# Altium PCB Main.PcbDoc
Units mm, origin at the board's own origin, x right, y up, seen from the top; angles counter-clockwise.
Board outline 26.86 x 26.25 mm, 2 copper layers (Top Layer, Bottom Layer), stack 1.135 mm thick; 12 components, 16 nets, 50 pads, 16 vias.
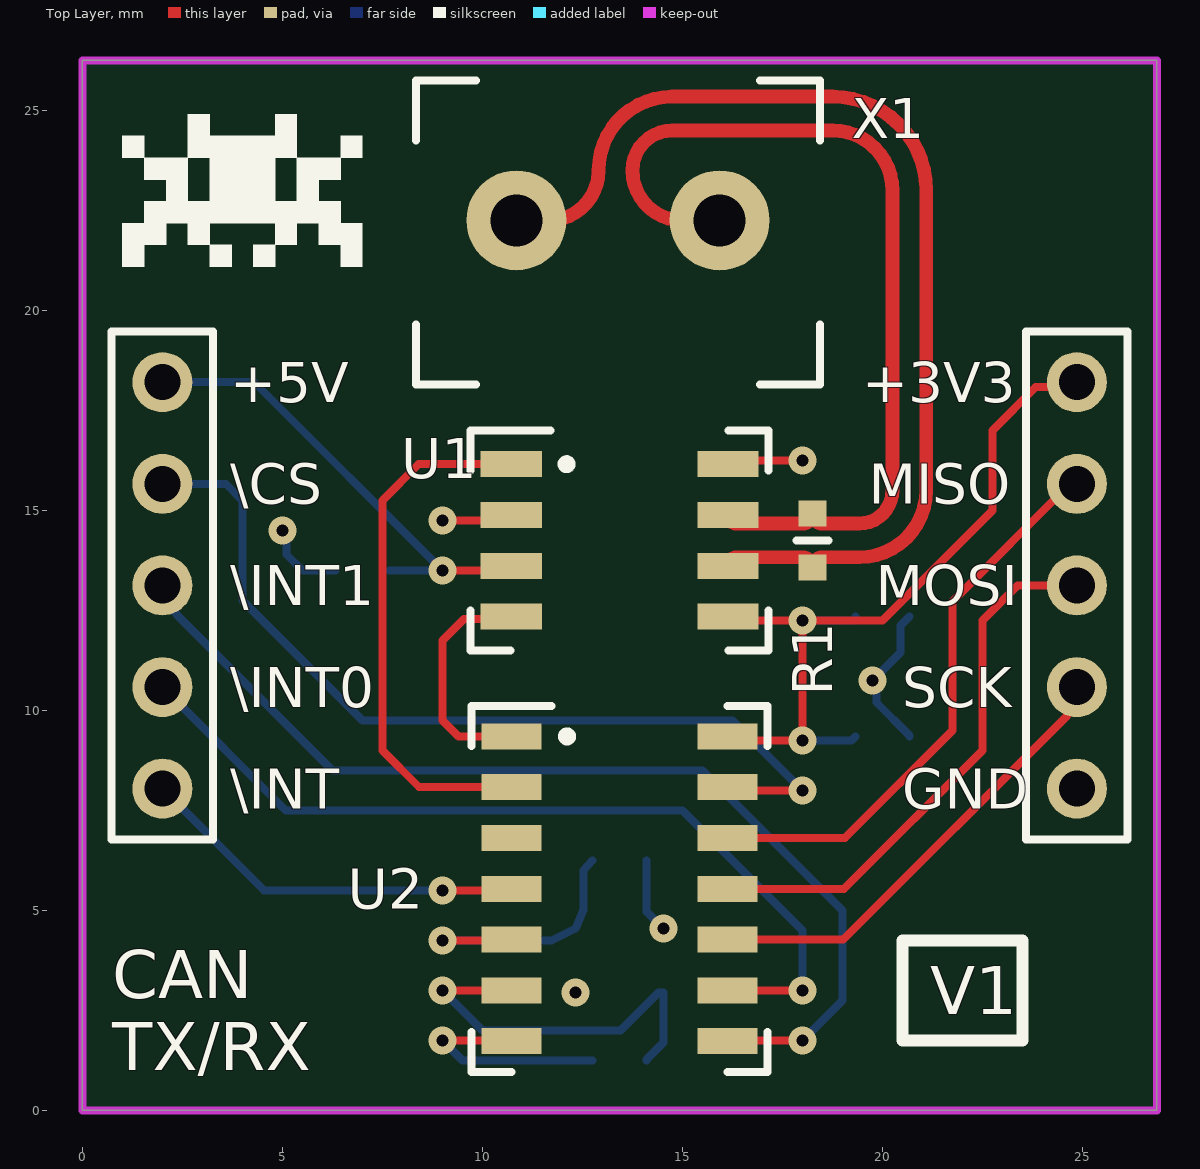
[diagram p0: Top Layer view]
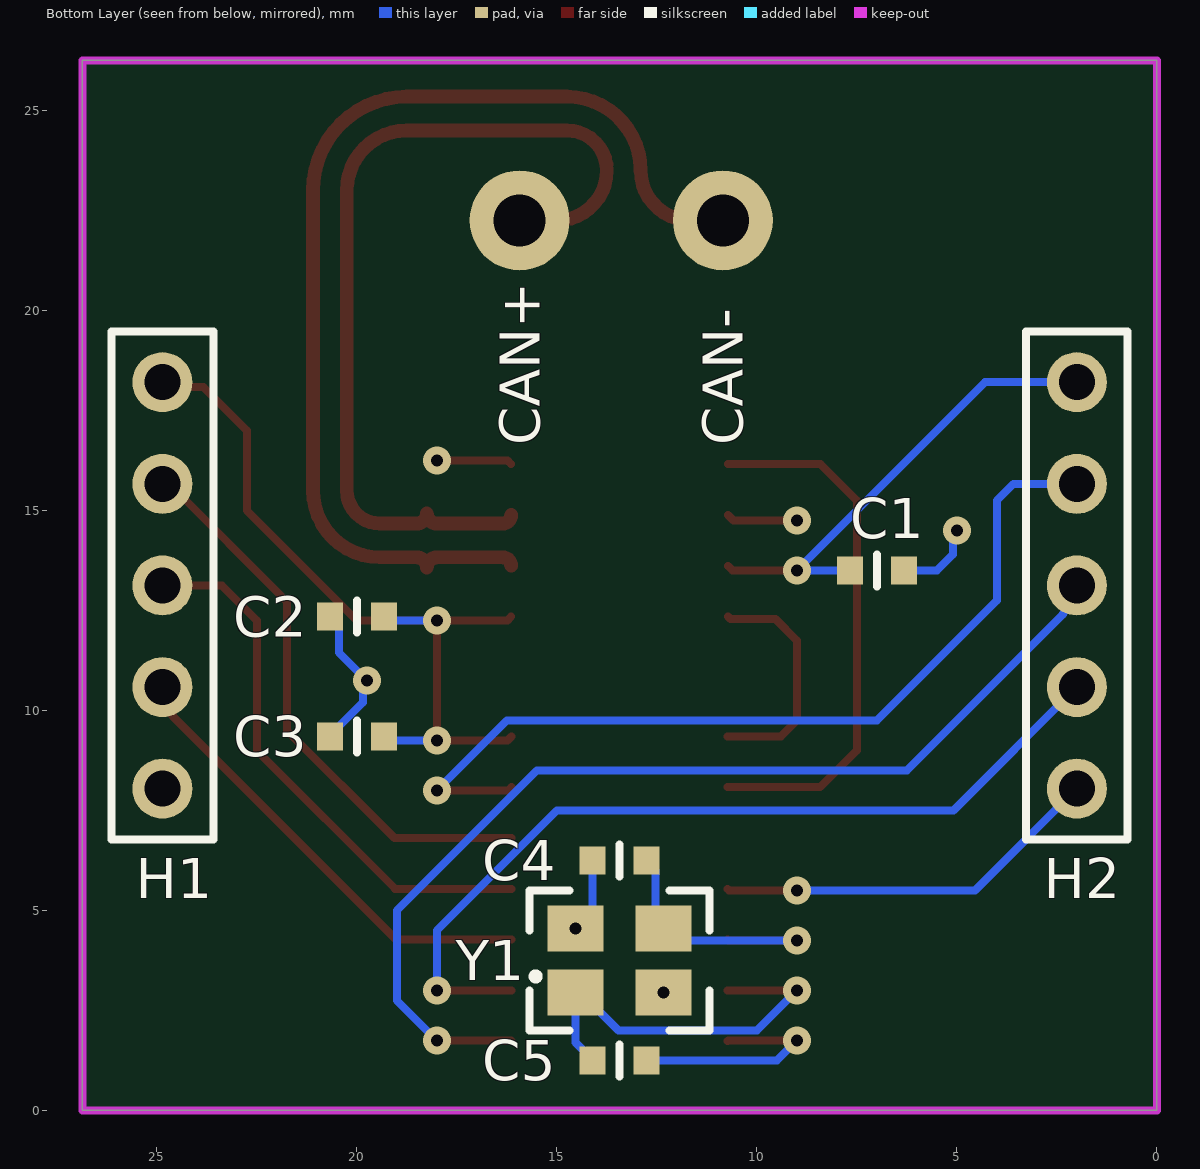
[diagram p1: Bottom Layer view, seen from below]
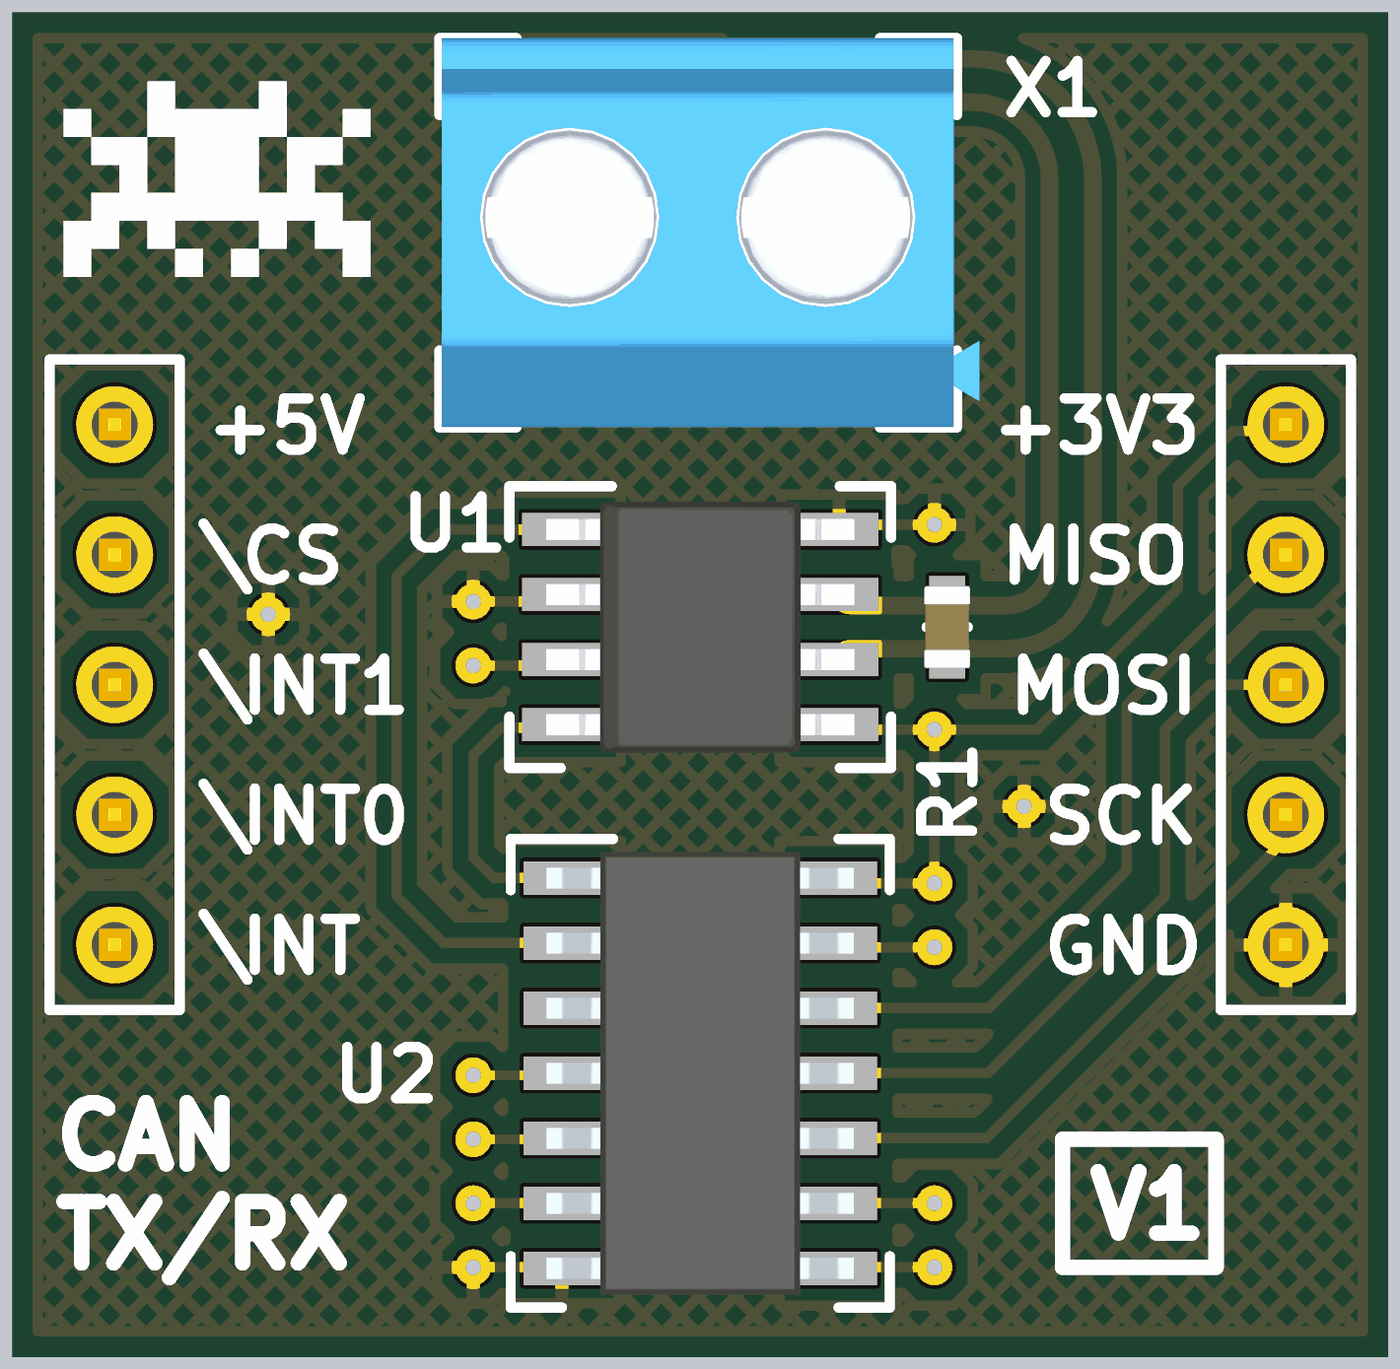
[diagram p2: 3D render of the assembled board from above, using the file's embedded part models]
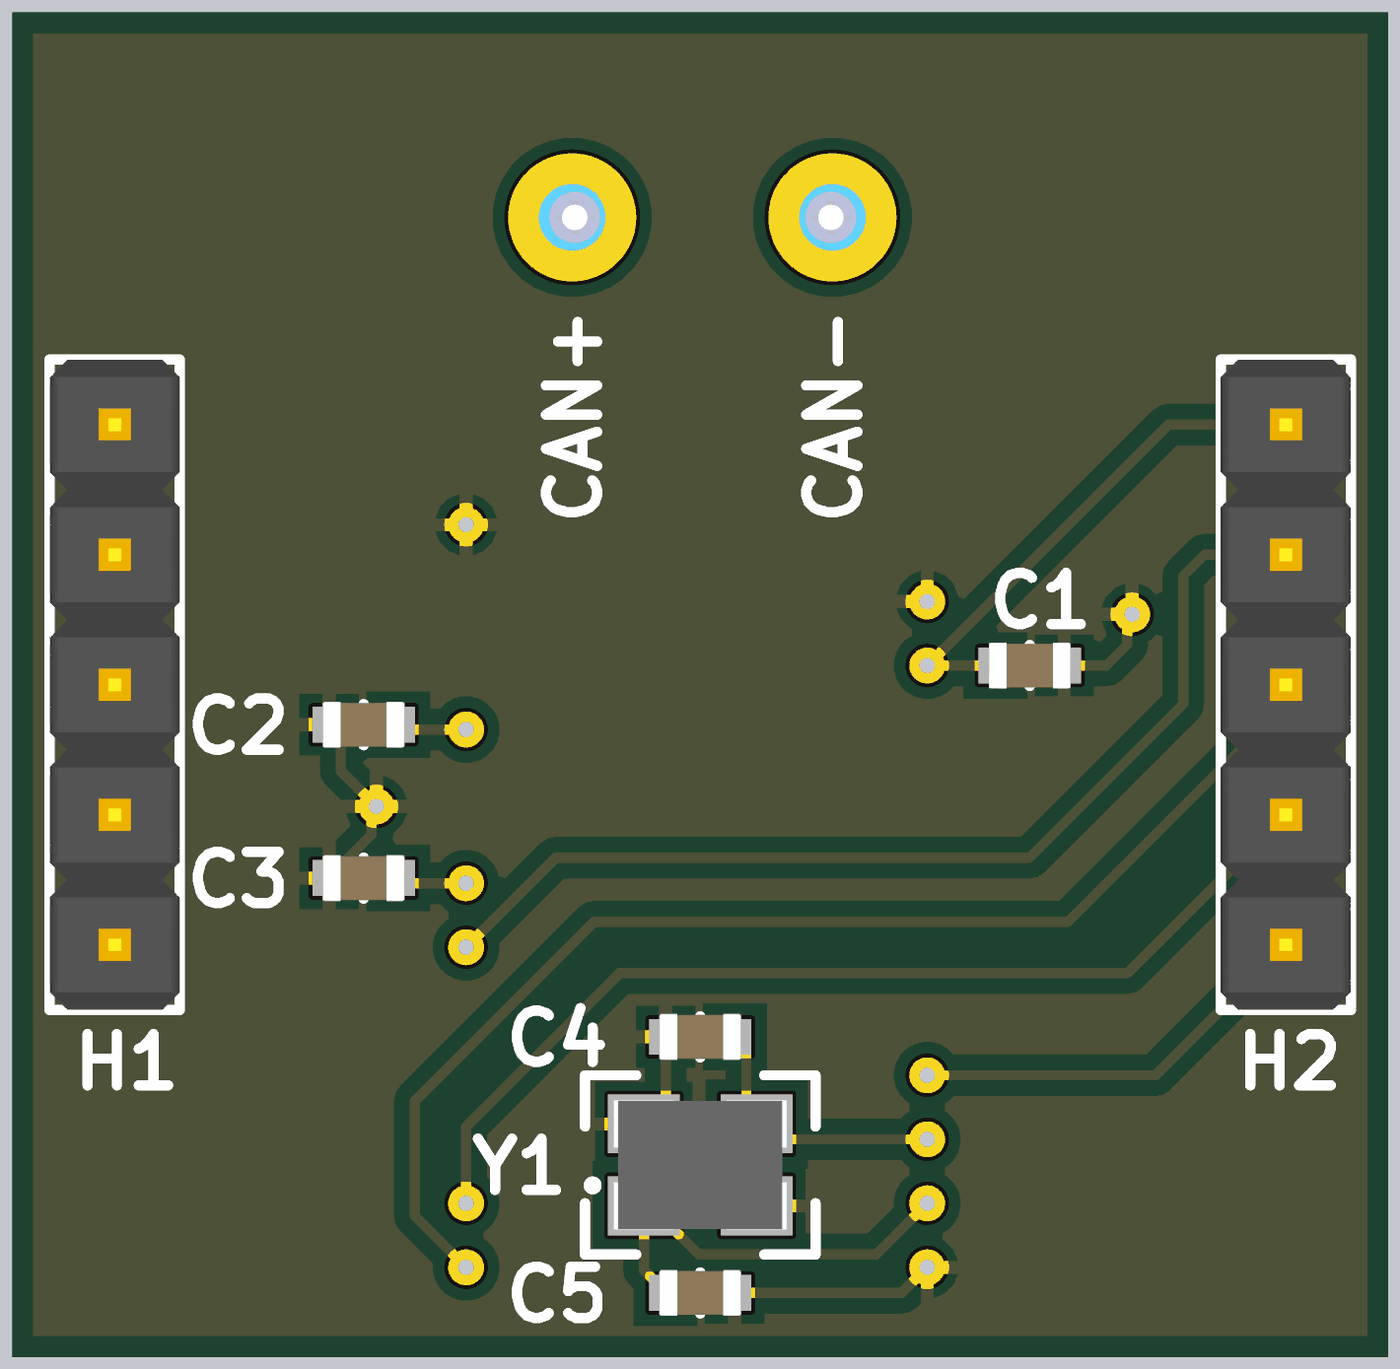
[diagram p3: 3D render of the assembled board from below, using the file's embedded part models]

## Layer stack, top to bottom
Top Solder: solder mask 0.0102, Solder Resist, Dk 3.8
Top Layer: signal copper 0.035
Dielectric 1: dielectric 1.065, FR-4, Dk 4.8
Bottom Layer: signal copper 0.035
Bottom Solder: solder mask 0.0102, Solder Resist, Dk 3.8

## Board outline
0,0 0,26.25 26.86,26.25 26.86,0

## Design rules (kind name [scope] priority, off if disabled: settings)
BoardOutlineClearance [All] p1: gap=0.2 ignorepadtopadclearanceinfootprint=FALSE
Clearance "inPolygon Clearance" [InPolygon] p1: gap=0.3 ignorepadtopadclearanceinfootprint=TRUE // this rule ensures that every net within a polygon of a different net has a set clearance from the poly
Clearance "Different Diff Pair" [All] p2: gap=0.2 ignorepadtopadclearanceinfootprint=TRUE
Clearance "Same Diff Pair" [All] p3: gap=0.1 ignorepadtopadclearanceinfootprint=TRUE
Clearance "Different Nets" [not InAnyDifferentialPair] p4: gap=0.3 ignorepadtopadclearanceinfootprint=TRUE except(0.1: Arc-SMDPad Arc-THPad Arc-Via Arc-Text Track-SMDPad Track-THPad Track-Via Track-Text SMDPad-Text THPad-Text Via-Text Fill-Text Poly-Text Region-Text Text-Text; 0.12: Arc-Arc Arc-Track Track-Track; 0.15: SMDPad-SMDPad SMDPad-THPad SMDPad-Via THPad-THPad THPad-Via Via-Via; 0.2: Arc-Hole Track-Hole SMDPad-Hole THPad-Hole Via-Hole Fill-Hole Poly-Hole Region-Hole Text-Hole)
Clearance "Same Net" [not InAnyDifferentialPair] p5: gap=0 ignorepadtopadclearanceinfootprint=TRUE except(0.1: THPad-Via; 0.18: Arc-Arc Arc-Track Track-Track)
ComponentClearance [All] p1: gap=0.102 collisioncheckmode=3 verticalgap=0.102 showdistances=TRUE
DiffPairsRouting "Ethernet Routing" [InDifferentialPairClass('Ethernet_Pairs')] p1: maxlimit=0.2 minlimit=0.2 mostfreqgap=0.2 toplayer_minwidth=0.25 toplayer_maxwidth=0.25 toplayer_prefwidth=0.25 bottomlayer_minwidth=0.25 bottomlayer_maxwidth=0.25 bottomlayer_prefwidth=0.25 impedanceprofiledriven=TRUE maxuncoupledlength=12.7
DiffPairsRouting "USB Routing" [InDifferentialPairClass('USB_Pairs')] p2: maxlimit=0.127 minlimit=0.127 mostfreqgap=0.127 toplayer_minwidth=0.23 toplayer_maxwidth=0.23 toplayer_prefwidth=0.23 bottomlayer_minwidth=0.23 bottomlayer_maxwidth=0.23 bottomlayer_prefwidth=0.23 impedanceprofiledriven=TRUE maxuncoupledlength=12.7
DiffPairsRouting "CAN Routing" [InDifferentialPairClass('CAN_Pairs')] p3: maxlimit=0.5 minlimit=0.5 mostfreqgap=0.5 toplayer_minwidth=0.345 toplayer_maxwidth=0.345 toplayer_prefwidth=0.345 bottomlayer_minwidth=0.345 bottomlayer_maxwidth=0.345 bottomlayer_prefwidth=0.345 impedanceprofiledriven=TRUE impedanceprofileid={5A9A793D-CB8E-4181-82AC-7E3341D9D95F} impedanceprofilevalue=120.000000 maxuncoupledlength=12.7
Height [All] p1: minheight=0 maxheight=1816.048 prefheight=12.7
HoleSize [All] p1: absolutevalues=TRUE maxlimit=6.3 minlimit=0.3 maxpercent=80.000 minpercent=20.000
HoleToHoleClearance [All] p1: gap=0.25 allowstackedmicrovias=FALSE
Length [All] p1: maxlimit=43.432 minlimit=0 usedelayunits=TRUE mindelay=0.000000 maxdelay=10000.000000
MatchedLengths "Diff Pair Matched Delays" [InDifferentialPairClass('Ethernet_Pairs') or InDifferentialPairClass('USB_Pairs') or InDifferentialPairClass('CAN_Pairs')] p1: tolerance=5 checknetsindiffpair=TRUE checkdiffpairvsdiffpair=FALSE checkxsignals=FALSE checkothers=FALSE usedelayunits=TRUE delaytolerance=100.000000
MinimumAnnularRing [All] p1: minimumring=0.2
MinimumSolderMaskSliver [All] p1: minsoldermaskwidth=0
PlaneClearance "Supply Net Clearance" [InNetClass('Supply_Nets')] p1: clearance=0.5
PlaneClearance "All Nets" [All] p2: clearance=0.3
PolygonConnect "Supply Nets" [InNetClass('Supply_Nets')] p1: connectstyle=Relief reliefconductorwidth=0.3 reliefentries=4 polygonreliefangle="90 Angle" conductorbypadedge=TRUE mindistance=0.381 enablemindistance=FALSE airgapwidth=0.254
PolygonConnect General [All] p2: connectstyle=Relief reliefconductorwidth=0.254 reliefentries=4 polygonreliefangle="90 Angle" airgapwidth=0.254
RoutingVias [All] p1: holewidth=0.2 width=0.35 viastyle="Through Hole" minholewidth=0.15 minwidth=0.3 maxholewidth=6.3 maxwidth=6.55
SilkToSilkClearance [All] p1: silktosilkclearance=0
SilkToSolderMaskClearance [All] p1: minsilkscreentomaskgap=0 clearancetoexposedcopper=TRUE
SolderMaskExpansion [All] p1: expansion=0.075 istentingtop=FALSE
SupplyNets "Schematic Supply Nets_3" [InNet('GND')] p1: voltage=0.000
SupplyNets "Schematic Supply Nets_2" [InNet('+5V')] p2: voltage=0.000
SupplyNets "Schematic Supply Nets_7" [InNet('+3V3')] p3: voltage=0.000
UnRoutedNet [All] p1: checkbadconnections=TRUE
Width "nRF Width" [InNetClass('nRF Signal')] p1: maxlimit=0.379 minlimit=0.379 preferedwidth=0.379 impedanceprofiledriven=TRUE minimp=50.000000 maximp=50.000000 favimp=50.000000 checkconnectedcopper=TRUE
Width [All] p2: maxlimit=100 minlimit=0.1 preferedwidth=0.3
20 further rules are at their usual default settings.

## Classes and differential pairs
differential pair class CAN_Pairs: CAN
component class Connectors: H2 X1
component class CAN: C2 C3 C5 R1 U1 U2 Y1
differential pair CAN: +CAN_P -CAN_N

## Components (designator, comment, footprint, x,y, rotation, side; value= is the part's Value field where it differs from the comment)
C1 "[Cap] 0603 0.1uF 10% 16V" "[Cap] SMD 0603" 7,13.5 r0 bottom (schematic designator C3)
C2 "[Cap] 0603 0.1uF 10% 16V" "[Cap] SMD 0603" 20,12.345 r180 bottom
C3 "[Cap] 0603 0.1uF 10% 16V" "[Cap] SMD 0603" 20,9.35 r180 bottom (schematic designator C1)
C4 "[Cap] 0603 15pF 1% 100V" "[Cap] SMD 0603" 13.43,6.25 r180 bottom (schematic designator C5)
C5 "[Cap] 0603 15pF 1% 100V" "[Cap] SMD 0603" 13.43,1.25 r0 bottom (schematic designator C4)
H1 "1x5 Header" "[Header] 1x5 Male" 24.86,13.125 r270 bottom (schematic designator H2)
H2 "1x5 Header" "[Header] 1x5 Male" 2,13.125 r270 bottom (schematic designator H1)
R1 "[120] SMD 0603 1% 1/10W" "[Res] SMD 0603" 18.25,14.25 r90 top
U1 "[CAN] Transceiver" "[CAN] Transceiver" 13.43,14.25 r0 top
U2 "[CAN] SPI-CAN FD Controller" "[CAN] SPI-CAN FD Controller" 13.43,5.54 r0 top
X1 "2pin Screw Terminal" "[Screw Terminal] 2pin 5mm" 13.43,22.25 r180 top (schematic designator X3)
Y1 "[Crystal] SMD 20MHz" "[Crystal] SMD 20MHz" 13.43,3.75 r180 bottom

## Footprints (in the part's own frame and the unit in brackets; to place one, negate y for a bottom-side part, rotate by r counter-clockwise, add the part's x,y. Pads: shape width x height; smd on the part's side, far side on the other; paste and mask are expansions set on the pad)
"[CAN] SPI-CAN FD Controller" [mm]
  rect 1.5x0.65 smd: 1(-2.7,3.81) 2(-2.7,2.54) 3(-2.7,1.27) 4(-2.7,0) 5(-2.7,-1.27) 6(-2.7,-2.54) 7(-2.7,-3.81) 8(2.7,-3.81) 9(2.7,-2.54) 10(2.7,-1.27) 11(2.7,0) 12(2.7,1.27) 13(2.7,2.54) 14(2.7,3.81)
  silkscreen extent -3.7,-4.57 3.7,4.57, body extent -3,-4.33 3,4.33, height 1.75
"[CAN] Transceiver" [mm]
  rect 1.528x0.65 smd: 1(-2.711,1.905) 2(-2.711,0.635) 3(-2.711,-0.635) 4(-2.711,-1.905) 5(2.711,-1.905) 6(2.711,-0.635) 7(2.711,0.635) 8(2.711,1.905)
  silkscreen extent -3.72,-2.75 3.72,2.75, body extent -3.01,-2.45 3.01,2.45, height 1.63
"[Cap] SMD 0603" [mm]
  rect 0.65x0.7 smd: 1(-0.675,0) 2(0.675,0)
  silkscreen extent 0,-0.4 0,0.4, body extent -0.8,-0.45 0.8,0.45, height 0.8
"[Crystal] SMD 20MHz" [mm] "TSX-3225 20.0000MF20G-AC3"
  rect 1.4x1.15 smd: 1(-1.1,-0.8) 2(1.1,-0.8) 3(1.1,0.8) 4(-1.1,0.8)
  silkscreen extent -2.25,-1.75 2.25,1.75, body extent -1.68,-1.26 1.69,1.26, height 0.7
"[Header] 1x5 Male" [mm]
  round 1.5 hole 0.9: 1(-5.08,0) 2(-2.54,0) 3(0,0) 4(2.54,0) 5(5.08,0)
  silkscreen extent -6.35,-1.27 6.35,1.27, body extent -6.35,-1.27 6.35,1.27, height 9.5
"[Res] SMD 0603" [mm]
  rect 0.65x0.7 smd: 1(-0.675,0) 2(0.675,0)
  silkscreen extent 0,-0.4 0,0.4, body extent -0.8,-0.45 0.8,0.45, height 0.8
"[Screw Terminal] 2pin 5mm" [mm]
  round 2.5 hole 1.3: 1(-2.5,0) 2(2.58,0)
  silkscreen extent -5.01,-3.5 5.09,4.1, body extent -5.45,-3.5 5.05,4.1, height 9.99

## Part data
C1 C2 C3: "CC0603KRX7R7BB104", Capacitance=100nF, Max Voltage=16V, Size Package=0603, Supplier Part Number 1=311-1088-6-ND, Tolerance=10%, Supplier 1=DigiKey
C4 C5: "GCM1885C2A150FA16D", Capacitance=15pF, Max Voltage=100V, Size Package=0603, Supplier Part Number 1=490-16416-1-ND, Tolerance=1%, Supplier 1=DigiKey
H1 H2: library part "[Header] 1x5 Male", "2.54mm pitch"
R1: "RC0603FR-07120RL", Resistance=120, Size Package=0603, Supplier Part Number 1=311-120HRCT-ND, Tolerance=1%, Supplier 1=DigiKey, Wattage=1/10W
U1: "ATA6561-GAQW-N", Supplier Part Number 1=ATA6561-GAQW-NCT-ND, Supplier 1=DigiKey
U2: "MCP2518FDT-E/SL", Supplier Part Number 1=MCP2518FDT-E/SLCT-ND, Supplier 1=DigiKey
X1: library part "[Screw Terminal] 2pin", "TB002-500-02BE", Supplier Part Number 1=102-6145-ND, Supplier 1=DigiKey
Y1: "TSX-3225 20.0000MF20G-AC3", Supplier Part Number 1=SER3629CT-ND, Supplier 1=DigiKey

## Via types
v1: diameter 0.7, hole 0.3, Top Layer to Bottom Layer, 16 vias

## Nets (pads, with @x,y where several pads share a name; then routed paths per layer and width w, separated by ;. In a path a pad name is that pad's centre, name@x,y a point inside that pad or via, vN(x,y) a via of type N, cw(c..) or ccw(c..) an arc to the next point about the centre after c; other vN are vias at no path point)
+3V3: C2.2 C3.2 H1.1 U1.5 U2.14 | length 20.1
  Top Layer w0.2: U2.14 16.23,9.25 v1(18,9.25) v1(18,12.25) ; U1.5 16.236,12.25 v1(18,12.25) ; H1.1 24.735,18.08 23.83,18.08 22.75,17 22.75,15 20,12.25 v1(18,12.25)
  Bottom Layer w0.2: v1(18,9.25) 19.225,9.25 C3.2 ; v1(18,12.25) 19.23,12.25 ccw(c19.23,12.345) C2.2
+5V: C1.2 H2.1 U1.3 | length 12
  Top Layer w0.2: v1(9,13.5) 10.604,13.5 U1.3
  Bottom Layer w0.2: H2.1 4.295,18.205 v1(9,13.5) C1.2
\CAN_CS: H2.2 U2.13 | length 22.5
  Top Layer w0.2: U2.13 16.21,8 v1(18,8)
  Bottom Layer w0.2: H2.2 3.585,15.665 4,15.25 4,12.75 7,9.75 16.25,9.75 v1(18,8)
\INT: H2.5 U2.4 | length 9.8
  Top Layer w0.2: v1(9,5.5) 10.69,5.5 U2.4
  Bottom Layer w0.2: H2.5 4.545,5.5 v1(9,5.5)
\INT0: H2.4 U2.9 | length 21.9
  Top Layer w0.2: U2.9 v1(18,3)
  Bottom Layer w0.2: H2.4 5.085,7.5 15,7.5 18,4.5 v1(18,3)
\INT1: H2.3 U2.8 | length 26.1
  Top Layer w0.2: U2.8 16.15,1.75 v1(18,1.75)
  Bottom Layer w0.2: H2.3 2,12.773 2.351,12.422 2.351,12.399 6.25,8.5 15.5,8.5 19,5 19,2.75 v1(18,1.75)
CAN_N: R1.1 U1.6 X1.2 | length 27.2
  Top Layer w0.345: X1.2 11.655,22.25 ccw(c11.655,23.5) 12.905,23.5 cw(c14.75,23.5) 14.75,25.345 18.75,25.345 cw(c18.75,23) 21.095,23 21.095,15.5 cw(c19.423,15.5) 19.423,13.827 18.502,13.827 ccw(c18.502,13.575) R1.1 ccw(c17.998,13.575) 17.998,13.827 16.354,13.827 ccw(c16.354,13.615) U1.6
CAN_P: R1.2 U1.7 X1.1 | length 23.3
  Top Layer w0.345: X1.1 15,22.25 cw(c15,23.5) 13.75,23.5 cw(c14.75,23.5) 14.75,24.5 18.75,24.5 cw(c18.75,23) 20.25,23 20.25,15.5 cw(c19.423,15.5) 19.423,14.673 18.502,14.673 cw(c18.502,14.925) R1.2 cw(c17.998,14.925) 17.998,14.673 16.354,14.673 cw(c16.354,14.885) U1.7
GND: C1.1 C2.1 C3.1 C4.1 C5.1 H1.5 U1.2 U1.8 U2.7 Y1.2 Y1.4 | length 17
  Top Layer w0.2: v1(9,1.75) 10.71,1.75 U2.7 ; v1(9,14.75) 10.584,14.75 U1.2 ; U1.8 16.236,16.25 v1(18,16.25)
  Bottom Layer w0.2: v1(5,14.5) 5.096,14.404 5.096,13.904 5.5,13.5 C1.1 ; v1(9,1.75) 9.5,1.25 C5.1 ; C4.1 14.105,4.975 v1(14.53,4.55) ; C3.1 20.675,9.375 19.846,10.204 19.846,10.654 v1(19.75,10.75) 20.45,11.45 20.45,12.12 C2.1
  other v1: 12.33,2.95
MISO: H1.2 U2.12 | length 14.3
  Top Layer w0.2: U2.12 19.06,6.81 21.75,9.5 21.75,12.725 24.69,15.665 H1.2
MOSI: H1.3 U2.11 | length 13.8
  Top Layer w0.2: U2.11 19.04,5.54 22.5,9 22.5,12.25 23.375,13.125 H1.3
NetU1_1: U1.1 U2.2 | length 13.5
  Top Layer w0.2: U1.1 8.405,16.155 7.5,15.25 7.5,9 8.42,8.08 U2.2
NetU1_4: U1.4 U2.1 | length 5.9
  Top Layer w0.2: U1.4 10.661,12.286 9.536,12.286 9,11.75 9,9.75 9.4,9.35 U2.1
OSC1_CAN: C5.2 U2.6 Y1.1 | length 9.9
  Top Layer w0.2: v1(9,3) U2.6
  Bottom Layer w0.2: v1(9,3) 10,2 13.455,2 14.405,2.95 Y1.1 14.53,1.7 14.105,1.275 C5.2
OSC2_CAN: C4.2 U2.5 Y1.3 | length 7
  Top Layer w0.2: v1(9,4.25) 10.71,4.25 U2.5
  Bottom Layer w0.2: v1(9,4.25) 9.25,4.25 11.73,4.25 Y1.3 12.53,5.025 12.53,6 C4.2
SCK: H1.4 U2.10 | length 11.6
  Top Layer w0.2: U2.10 19.02,4.27 24.611,9.861 24.611,10.336 H1.4
pads on no net: U2.3

## Polygon pours and split planes (outlines as drawn)
GND on Bottom Layer "GND Poly" (solid, remove dead copper, shelved, pour order 0): 0,26.25 26.86,26.25 26.86,0 0,0
GND on Top Layer "GND Top Poly" (hatched 45Degree grid 0.508 track 0.203, shelved, pour order 1): 0,0 26.86,0 26.86,26.25 0,26.25

## Keep-outs
Keep-Out Layer:
  the board outline again, w0.2

## Silkscreen, mask and mechanical layers (free items; w line width, h text height)
Top Overlay:
  region: 4.818,21.593 4.818,21.091 4.273,21.091 4.273,21.636 4.273,21.637 4.818,21.637 4.818,21.594
  region: 3.385,21.091 3.182,21.091 3.182,21.637 3.726,21.637 3.726,21.636 3.727,21.636 3.727,21.091 3.386,21.091
  region: 1,24.211 1,24.364 1.545,24.364 1.545,24.363 1.545,23.818 1,23.818 1,24.21
  region: 6.454,23.987 6.454,24.363 6.455,24.363 6.455,24.364 7,24.364 7,23.818 6.454,23.818 6.454,23.986
  region: 2.646,24.909 3.182,24.909 3.182,24.364 4.818,24.364 4.818,24.909 5.363,24.909 5.363,23.818 4.818,23.818 4.818,22.728 5.363,22.728 5.363,23.818 6.454,23.818 6.454,23.274 6.454,23.273 5.909,23.273 5.909,22.728 6.454,22.728 6.454,22.727 6.454,22.182 7,22.182 7,21.091 6.454,21.091 6.454,21.637 5.91,21.637 5.909,21.637 5.909,22.182 5.363,22.182 5.363,21.637 4.818,21.637 4.818,22.182 3.182,22.182 3.182,21.637 2.637,21.637 2.636,21.637 2.636,22.182 2.091,22.182 2.091,21.637 2.09,21.637 1.545,21.637 1.545,21.091 1,21.091 1,22.182 1.545,22.182 1.545,22.727 1.546,22.727 1.546,22.728 2.091,22.728 2.091,23.273 1.546,23.273 1.546,23.274 1.545,23.274 1.545,23.818 2.636,23.818 2.636,22.728 3.182,22.728 3.182,23.818 2.636,23.818 2.636,24.909 2.645,24.909
  lines w0.3: 20.5,1.75 23.5,1.75 23.5,4.25 20.5,4.25 20.5,1.75
  text "+5V" at 3.7,17.705 h1
  text "+3V3" at 19.495,17.705 h1
  text "\CS" at 3.7,15.165 h1
  text "MISO" at 19.661,15.165 h1
  text "\INT1" at 3.7,12.625 h1
  text "MOSI" at 19.828,12.625 h1
  text "\INT0" at 3.7,10.085 h1
  text "SCK" at 20.494,10.085 h1
  text "\INT" at 3.7,7.545 h1
  text "GND" at 20.494,7.545 h1
  text "V1" at 21.2,2.4 h1.2
  text "CAN / TX/RX" at 0.75,1 h1.2
Bottom Overlay:
  text "CAN-" at 10.35,16.635 h1 r270
  text "CAN+" at 15.43,16.635 h1 r270